# Altium PCB 0.PCB1.PcbDoc (part 2 of 10)
Units mil, origin at the board's own origin, x right, y up, seen from the top; angles counter-clockwise.
Board outline 3897.64 x 3897.64 mil, 6 copper layers (Top Layer, Layer 1, Layer 3, Layer 4, Layer 2, Bottom Layer), stack 60.567 mil thick; 715 components, 563 nets, 2530 pads, 1442 vias.
Unrouted connection lines stored in the file: 6.
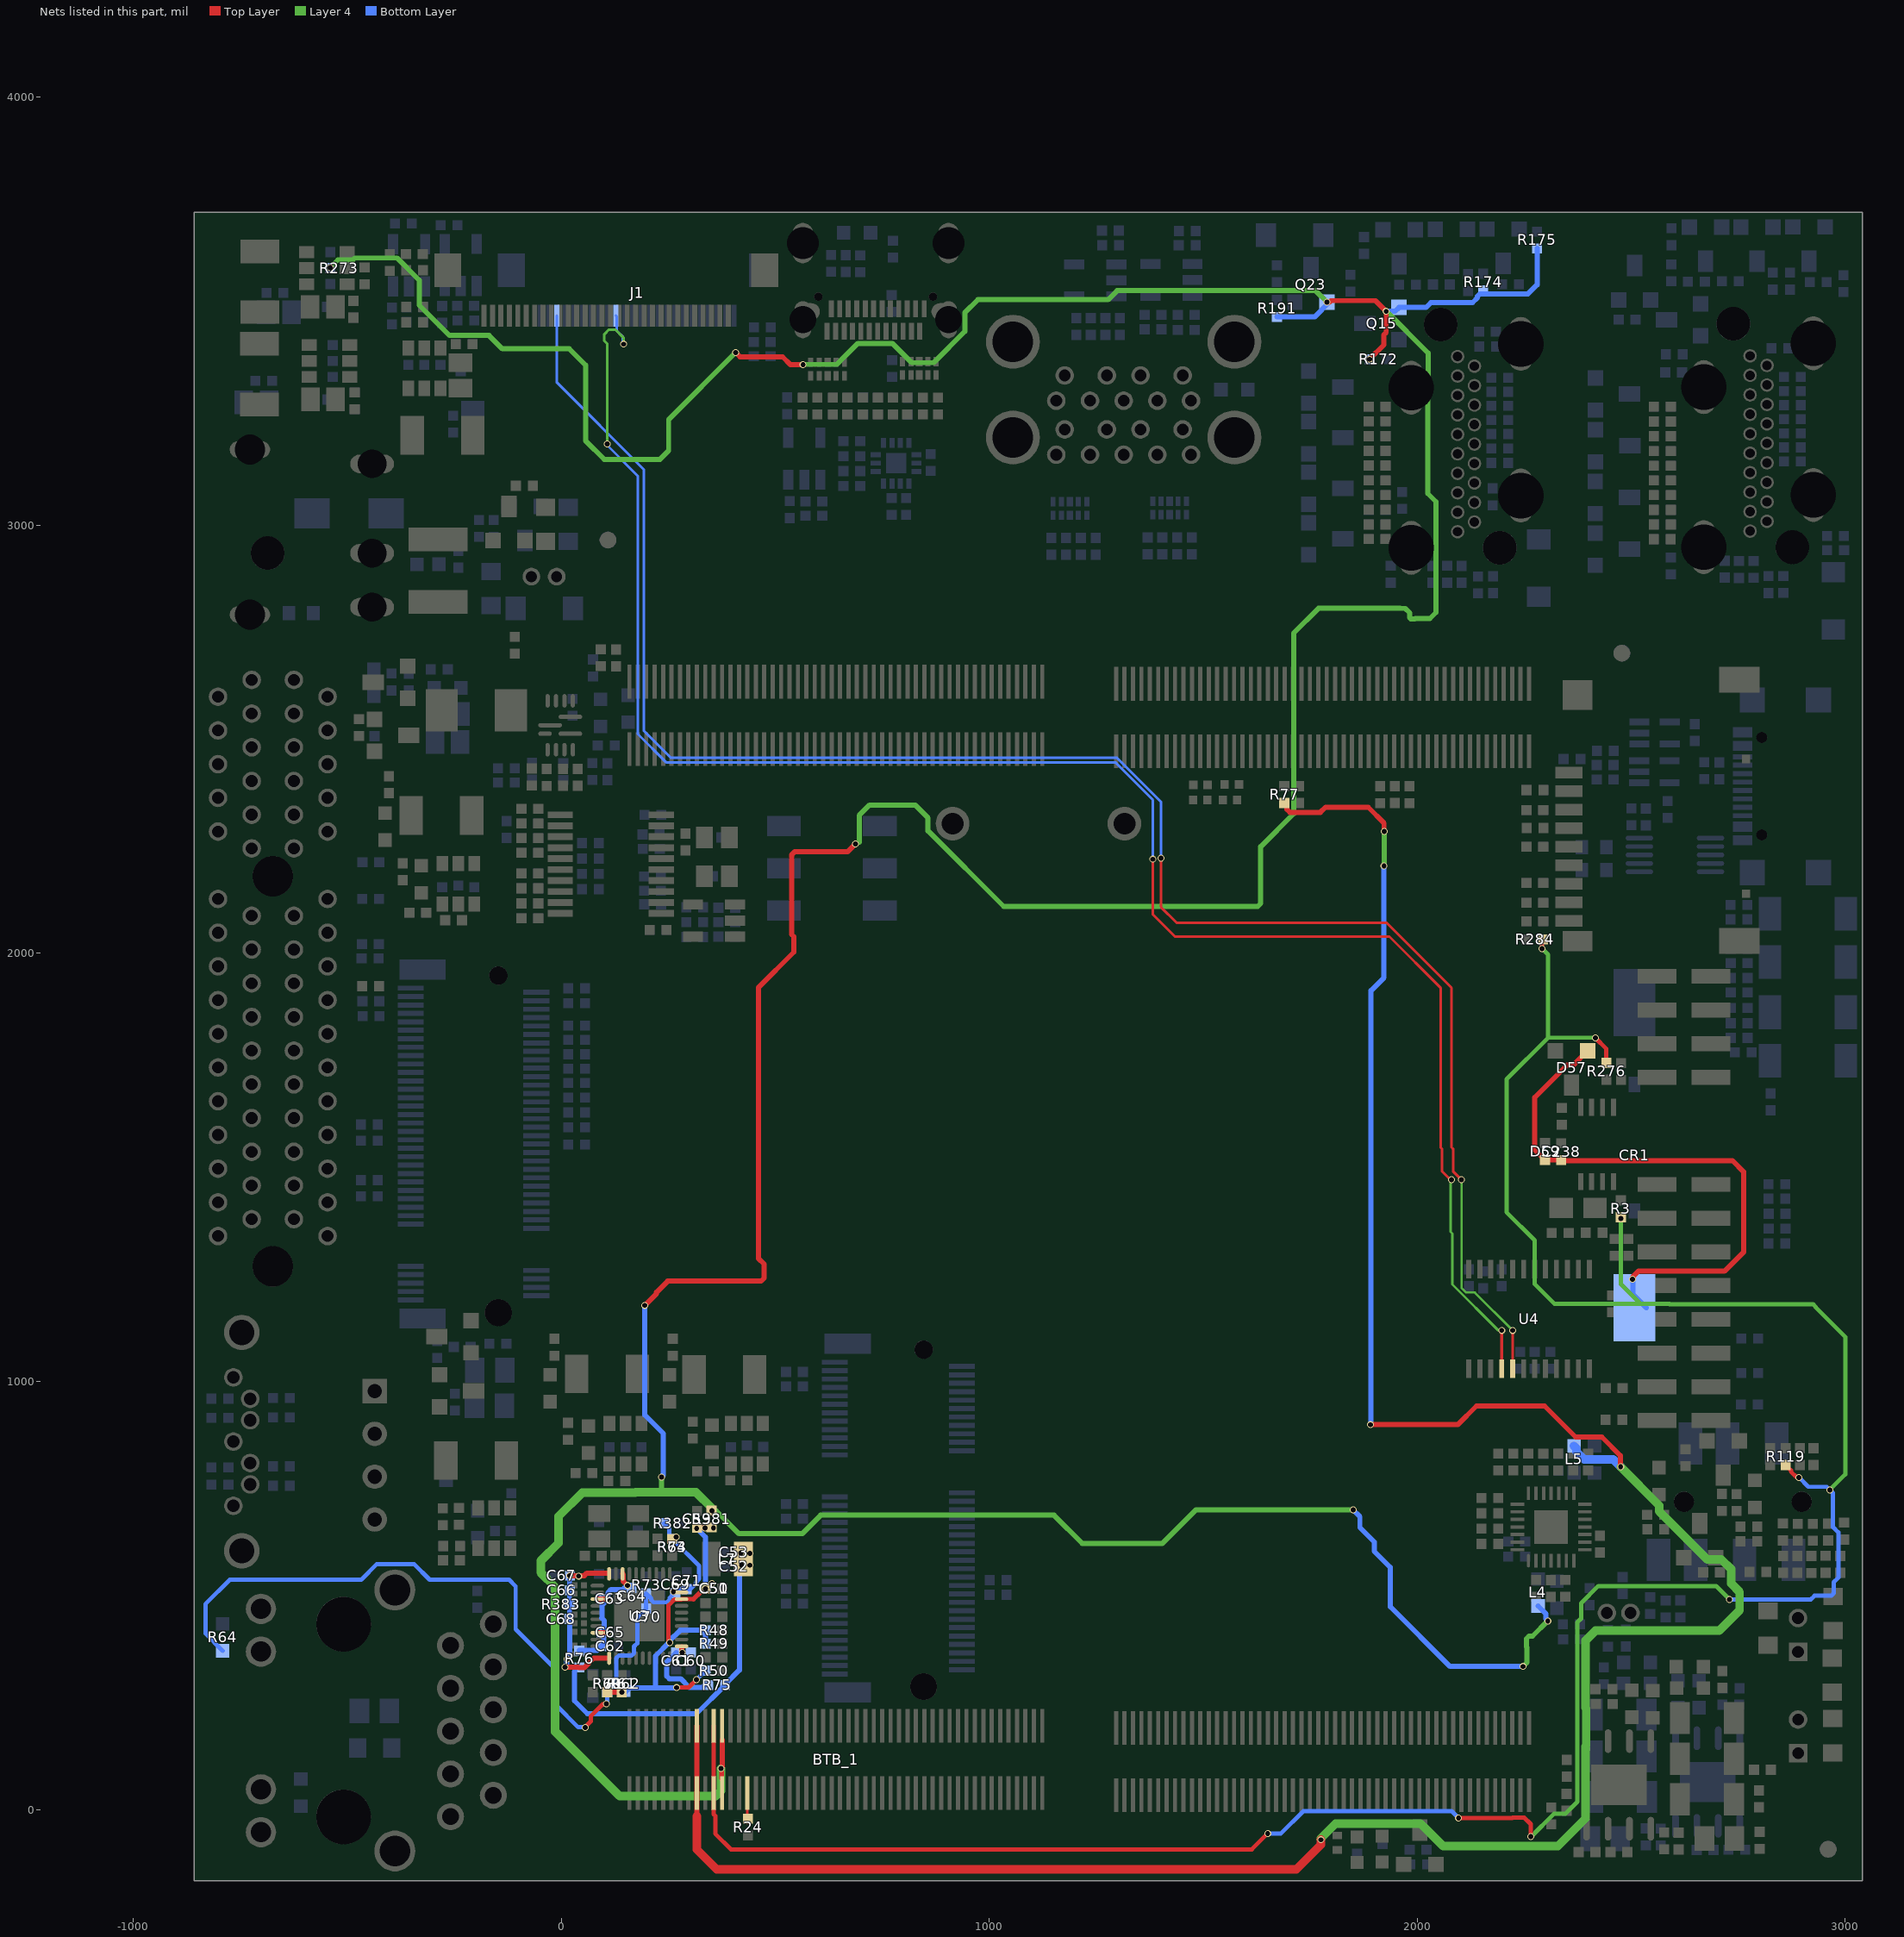
[diagram p6: the nets of this part, all layers, seen from the top]

## Components (designator, comment, footprint, x,y, rotation, side; value= is the part's Value field where it differs from the comment) (continued)
R137 "0R" R0402 -445.1,1923.3 r180 bottom
R138 "100K" R0402 337.09,790.05 r180 top
R139 "10K" R0402 415.06,768.85 r180 top
R140 "1K" R0402 433.9,830.72 r90 bottom
R141 "30K" R0402 337.09,790.05 r180 bottom
R142 "2.2R" R0402 545.29,1021.95 r0 bottom
R143 "2.2R" R0402 545.29,988.15 r0 bottom
R144 "1K" R0402 1020.69,535.95 r0 bottom
R145 "22R" R0402 545.29,549.65 r0 bottom
R146 "1K" R0402 1020.59,501.55 r0 bottom
R147 "4.7K" R0402 545.29,480.75 r0 bottom
R148 "22R" R0402 545.29,515.35 r0 bottom
R149 "20K" R0402 1947.7,2370.7 r270 top
R150 "10K" R0402 1981.9,2370.62 r90 top
R151 "4.7K" R0402 2600.5,3399.21 r0 bottom
R152 "4.7K" R0402 2593.4,3589.79 r270 bottom
R153 "1K" R0402 2830.6,3570.21 r90 bottom
R154 "4.7K" R0402 2995.7,3564.31 r90 bottom
R155 "4.7K" R0402 2936.9,3568.21 r180 bottom
R156 "0R" R0402 2599.02,3357.11 r180 bottom
R157 "47K" R0402 2731.4,3570.01 r0 bottom
R158 "47K" R0402 2652.3,3569.11 r180 bottom
R159 "1.2K" R0402 2592.6,2904.8 r90 bottom
R160 "47K" R0402 2594,3673.91 r270 bottom
R161 "499R" R0402 2572.7,3035.99 r180 bottom
R162 "499R" R0402 2572.7,3070.39 r180 bottom
R163 "499R" R0402 2572.7,3242.39 r180 bottom
R164 "499R" R0402 2572.7,3276.79 r180 bottom
R165 "499R" R0402 2572.7,3173.59 r180 bottom
R166 "499R" R0402 2572.7,3207.99 r180 bottom
R167 "499R" R0402 2572.7,3104.79 r180 bottom
R168 "499R" R0402 2572.7,3139.19 r180 bottom
R169 "1K" R0402 2572.6,2967.51 r180 bottom
R170 "27K" R0402 2490.3,3480.31 r180 bottom
R171 "10K" R0402 2573.1,3002.21 r0 bottom
R172 "4.7K" R0402 1909.1,3387.74 r0 bottom
R173 "10K" R0402 1843.7,3565.46 r270 bottom
R174 "1K" R0402 2154.3,3567.94 r90 bottom
R175 "4.7K" R0402 2280,3666.34 r90 bottom
R176 "10K" R0402 2218.22,3562.74 r180 bottom
R177 "0R" R0402 1938.21,2885.54 r270 bottom
R178 "47K" R0402 2056.3,3562.44 r180 bottom
R179 "47K" R0402 1977.62,3561.94 r180 bottom
R180 "1.2K" R0402 1965,3057.8 r270 bottom
R181 "47K" R0402 1875.6,3653.64 r270 bottom
R182 "499R" R0402 1906.5,3035.94 r180 bottom
R183 "499R" R0402 1906.5,3070.42 r180 bottom
R184 "499R" R0402 1906.5,3242.77 r180 bottom
R185 "499R" R0402 1906.5,3277.24 r180 bottom
R186 "499R" R0402 1906.5,3173.83 r180 bottom
R187 "499R" R0402 1906.5,3208.3 r180 bottom
R188 "499R" R0402 1906.5,3104.89 r180 bottom
R189 "499R" R0402 1906.5,3139.36 r180 bottom
R190 "1K" R0402 1905.81,3002.04 r180 bottom
R191 "27K" R0402 1672.5,3506.34 r90 bottom
R192 "10K" R0402 1906.01,2967.84 r0 bottom
R193 "100R" R0402 2840.2,1460.8 r180 bottom
R194 "100R" R0402 2493.4,1313 r270 top
R195 "100R" R0402 2776.1,946.2 r180 bottom
R196 "100R" R0402 2459.9,910.3 r180 top
R197 "100R" R0402 2777,1019.8 r180 bottom
R198 "100R" R0402 2460.2,984.4 r180 top
R199 "100R" R0402 2776.9,1100.2 r180 bottom
R210 "0R" R0805 2970.7,172.3 r270 top
R211 "0R" R0805 2969.9,313.7 r270 top
R212 "0R" R0805 2971.6,457.73 r270 top
R213 "0R" R0805 2819.5,423.8 r270 top
R216 "33R" R0402 -73.2,2081.63 r180 top
R217 "33R" R0402 -73.2,2116.63 r180 top
R218 "100K" R0402 112.8,826.84 r90 bottom
R219 "49.9R" R0402 -73.2,2116.63 r0 bottom
R220 "49.9R" R0402 -73.2,2081.63 r0 bottom
R221 "1K" R0402 150.2,826.84 r90 bottom
R222 "10K" R0402 130.12,767.4 r180 top
R223 "10K" R0402 210.1,2277.53 r0 bottom
R224 "4.7K" R0402 210.58,2243.73 r0 bottom
R225 "10K" R0402 213.5,2146.33 r0 bottom
R226 "10K" R0402 213.98,2114.43 r0 bottom
R227 "30K" R0402 53.42,785.8 r180 bottom
R228 "33R" R0402 -73.2,2151.63 r180 top
R229 "33R" R0402 -73.2,2186.63 r180 top
R230 "22R" R0402 290.18,2260.25 r270 top
R231 "49.9R" R0402 -73.2,2186.63 r0 bottom
R232 "49.9R" R0402 -73.2,2151.63 r0 bottom
R233 "10K" R0402 213.18,2179.63 r180 bottom
R234 "470R" R0402 214.35,2323.56 r180 bottom
R235 "2.2R" R0402 68.38,2221.5 r180 bottom
R236 "10K" R0402 36.1,1831.2 r0 bottom
R237 "10K" R0402 36.22,1553.1 r0 bottom
R238 "33R" R0402 -73,2234.63 r180 top
R239 "33R" R0402 -73,2268.97 r180 top
R240 "49.9R" R0402 -73,2268.97 r0 bottom
R241 "49.9R" R0402 -73,2234.63 r0 bottom
R242 "33R" R0402 -73,2303.3 r180 top
R243 "33R" R0402 -73,2337.63 r180 top
R244 "49.9R" R0402 -127.7,2289.3 r270 bottom
R245 "49.9R" R0402 -73,2303.3 r0 bottom
R246 "1K" R0402 386.98,2106.43 r180 bottom
R247 "0R" R0402 -444.6,2212.5 r180 bottom
R248 "0R" R0402 -445.3,2127.1 r180 bottom
R249 "100K" R0402 -334.88,2094.8 r180 top
R250 "30K" R0402 -277.78,2134.54 r90 bottom
R251 "1K" R0402 -251.26,2077.4 r180 top
R252 "10K" R0402 -240.38,2138.48 r90 bottom
R255 "10K" R0402 -356.05,2633.67 r270 bottom
R256 "1K" R0402 -472.35,2527.57 r90 top
R257 "10K" R0402 -436.15,2527.17 r270 bottom
R271 "20K" R0402 -513.93,3346.4 r180 bottom
R272 "100K" R0402 -485.21,3504.71 r270 top
R273 "1K" R0402 -519.55,3600.68 r180 bottom
R274 "30K" R0402 -519.55,3563.27 r180 bottom
R275 "22R" R0402 2361.7,2453.8 r180 bottom
R276 "10K" R0402 2442,1724.58 r270 top
R277 "22R" R0402 2476.5,1724.08 r90 top
R278 "22R" R0402 2275.16,2381.32 r0 top
R279 "22R" R0402 2275.08,2334.42 r0 top
R280 "0R" R0402 2275.08,2248.92 r0 top
R281 "22R" R0402 2275.08,2164.32 r0 top
R282 "22R" R0402 2275.08,2118.32 r0 top
R283 "100R" R0402 2275.08,2075.02 r0 top
R284 "NC" R0402 2274.58,2032.7 r180 top
R285 "0R" R0402 2439.31,2473.22 r0 bottom
R290 "100R" R0402 2534.26,2318.6 r90 bottom
R291 "100R" R0402 2500.66,2319.2 r90 bottom
R301 "NC" R0402 -342.9,3633.2 r0 top
R303 "NC" R0402 -342.4,3595.6 r0 top
R306 "1K" R0402 -400.5,3613.9 r90 top
R308 "3.4K" R0402 -278.1,3492.62 r270 bottom
R309 "3.4K" R0402 -395.5,3489.12 r270 bottom
R316 "115K" R0402 -255.82,615.47 r180 bottom
R317 "10K" R0402 -117.92,631.09 r90 bottom
R318 "1K" R0402 -154.92,630.97 r90 bottom
R319 "10K" R0402 -289.62,1074.5 r90 bottom
R320 "1K" R0402 -147.8,1088.1 r180 bottom
R321 "10K" R0402 -231.1,1080.6 r180 bottom
R322 "20K" R0402 -256.4,582.07 r180 top
R323 "3.4K" R0402 1460.2,3491.23 r180 bottom
R324 "NC" R0402 1383,3457.96 r180 bottom
R325 "470R" R0402 2557.41,654.82 r180 top
R326 "300K" R0402 2774.71,626.52 r180 top
R327 "0R" R0402 2796.11,554.82 r0 top
R328 "10K" R0402 -445.1,1923.3 r180 top
R334 "1K" R0402 2002.22,-93.8 r180 bottom
R335 "10K" R0402 2003.42,-128.2 r0 bottom
R341 "0R" R0603 2637.01,333.55 r180 top
R342 "NC" R0603 2637.41,283.95 r180 top
R343 "20K" R0402 2576.71,-73.45 r90 top
R344 "20K" R0402 2471.41,-99.65 r0 top
R345 "1K" R0402 2348.81,16.83 r270 top
R346 "10K" R0402 2313.4,-14.7 r90 top
R347 "0R" R0603 2513.21,294.45 r0 bottom
R348 "NC" R0603 2513.51,343.65 r0 bottom
R349 "20K" R0402 2569.01,-64.33 r90 bottom
R350 "20K" R0402 2672.59,-94.65 r180 bottom
R351 "1K" R0402 2799.9,-72 r270 top
R352 "10K" R0402 2798.6,24.7 r90 top
R354 "27K" R0402 1672.1,3587.64 r90 bottom
R373 "0R" R0201 42.53,523.9 r180 top
R374 "0R" R0201 42.53,504.2 r180 top
R375 "0R" R0201 42.53,474.9 r180 top
R376 "0R" R0201 42.53,455.1 r180 top
R377 "0R" R0201 42.53,434.9 r180 top
R378 "0R" R0201 42.53,415 r180 top
R379 "0R" R0201 42.53,383.1 r180 top
R380 "0R" R0201 42.53,363.1 r180 top
R381 "0R" R0402 351.2,678.7 r90 top
R382 "0R" R0402 260.32,668.7 r0 bottom
R383 "0R" R0402 -0.1,478.6 r180 bottom
R386 "1M" R0402 146.36,593.08 r0 top
R387 "22R" R0402 74.9,592.71 r0 top
SPK1 "FS1508MB0810-H8.0" BEEP-TH_BD15.0-P10.20-D1.2 1115.31,2302.9 r180 bottom
SW1 "GT-TC029B-H020-L1N" SW-SMD_L3.9-W2.9-P4.15-LS5.0 2912.81,1748.9 r180 bottom
SW2 "GT-TC029B-H020-L1N" SW-SMD_L3.9-W2.9-P4.15-LS5.0 2912.81,1862.3 r180 bottom
SW3 "GT-TC029B-H020-L1N" SW-SMD_L3.9-W2.9-P4.15-LS5.0 2912.81,1979.5 r180 bottom
SW4 "GT-TC029B-H020-L1N" SW-SMD_L3.9-W2.9-P4.15-LS5.0 2912.81,2092.1 r180 bottom
SW5 "MST22D18G2" SW-SMD_MST22D18G2 632.3,2198.6 r270 bottom
U1 "ASP9135ZC-R" SOT23_6 -319.6,3367.02 r0 top
U2 "MP8759GD-Z" QFN12-2R00X3R00 -2.12,2532.79 r180 top
U3 "RTL8211F" qfp_40p_r 182.89,452.11 r0 top
U4 "XL9535" TSSOP24-0R65-7R80X4R40 2261.4,1145.8 r90 top
U5 "FUSB302BMPX" WQFN14-0R50-2R5X2R5EP1R45X1R45 782.66,3145 r0 bottom
U6 "LPW5209AB5F" SOT23-5 568,3155.6 r180 bottom
U7 "LPW5209AB5F" SOT23-5 1248,3572.03 r270 bottom
U8 "RCLAMP0524P" USON_10 836.87,3366.65 r0 top
U9 "RCLAMP0524P" USON_10 622.53,3364.75 r0 top
U10 "RCLAMP0524P" USON_10 1188.59,3039.08 r0 bottom
U11 "RCLAMP0524P" USON_10 1421.51,3040.38 r0 bottom
U16 "ES8388" qfn28_0r45-4x4EP2R6X2R6 2312.97,659.92 r90 top
U17 "ASP9135ZC-R" SOT23_6 433.9,854.34 r180 top
U18 "CH340E" MSOP-10_L3.0-W3.0-P0.50-LS5.0-BL -10891.9,20223.34 r270 bottom
U23 "D2315-3R3" DFN1006-2L-BI 1813.4,-77.5 r90 top
U25 "ASP9135ZC-R" SOT23_6 150.2,854.4 r180 top
U26 "RS2CG5705BLE" TSSOP20 115.92,2208.41 r90 top
U27 "TP5108E23E-33" SOT23-5 357.28,2076.43 r90 top
U28 "ASP9135ZC-R" SOT23_6 -240.38,2162.1 r180 top
U31 "ASP9135ZC-R" SOT23_6 -541.49,3383.8 r270 top
U32 "ASP9135ZC-R" SOT23_6 -547.11,3600.68 r270 top
U33 "74LVC1G125GW" SOT-353 2554.03,2424.54 r90 bottom
U34 "74LVC1G125GW" SOT-353 2554.53,2515.04 r90 bottom
U35 "BM8563EMA" msop-8 2420.3,1553.7 r0 top
U39 "LPW5209AB5F" SOT23-5 -234.73,3607.89 r180 bottom
U40 "LPW5209AB5F" SOT23-5 -355.4,3607.2 r180 bottom
U42 "NS4110B" SOP-8-EP-2R5X3R4 2470.91,57.45 r0 top
U43 "ASP9135ZC-R" SOT23_6 -156.42,657.57 r180 top
U46 "NS4110B" SOP-8-EP-2R5X3R4 2678.41,64.15 r180 bottom
U48 "LPW5209AB5F" SOT23-5 1425.8,3572.93 r270 bottom
USBC1 "ZX-TYPEC-WTM1628" USB-C-SMD_ZX-TYPEC-WTM1628 2893.76,2390.32 r270 bottom
Y2 "25MHz" 3225 133.98,661.71 r0 top
Y4 "25MHz" 3225 363.98,2225.33 r90 top
Y5 "32.768KHz" 3215 2375.9,1405.1 r0 top

## Footprints (in the part's own frame and the unit in brackets; to place one, negate y for a bottom-side part, rotate by r counter-clockwise, add the part's x,y. Pads: shape width x height; smd on the part's side, far side on the other; paste and mask are expansions set on the pad)
3215 [mil] "3215"
  rect 55.12x47.24 smd: 1(-39.4,0) 2(39.4,0)
  silkscreen extent -75,-35 75,35, body extent -67,-24 67,24, height 150
3225 [mm] "3225"
  rect 1.3x1 smd: 1(-1.15,-0.75) 2(1.15,-0.75) 3(1.15,0.75) 4(-1.15,0.75)
  silkscreen extent -2.41,-1.52 0.3,1.2, body extent -1.9,-1.4 1.9,1.4, height 3.81
audio_smd_7p_6r0x8r8 [mm] "AUDIO_SMD_7P_6R0X8R8"
  rect 2.5x1.4 smd: 1(3.45,-3.125) 2(3.45,-0.225) 3(3.45,2.675) 4(-3.45,2.975) 6(-3.45,-2.125) 7(-3.45,0.775) 8(3.45,4.875)
  round 1.2 hole 1.2 unplated: ""(0,-3.625) ""(0,3.375)
  silkscreen extent -3,-7.13 4.25,7.38, body extent -5,-7.63 5,7.63, height 3.81
BEEP-TH_BD15.0-P10.20-D1.2 [mm]
  round 2 hole 1.3 paste+0 mask+0.051: 1(-5.1,0) 2(5.1,0)
  silkscreen extent -7.5,-7.5 7.5,7.5
C0402 [mil] "C0402"
  rect 23.6x23.6 smd: 1(-19.68,0) 2(19.68,0)
  silkscreen extent -37,-17 37,17, body extent -37,-17 37,17, height 150
C0603 [mil] "C0603"
  rect 31.5x31.5 smd: 1(-31.5,0) 2(31.5,0)
  silkscreen extent -55,-25 55,25, body extent -48,-16 48,16, height 150
C0603_L [mm] "贴片MLCC电容"
  rect 0.75x0.85 smd: 1(-0.725,0) 2(0.725,0)
  silkscreen extent -1.35,-0.69 1.35,0.69, body extent -0.8,-0.4 0.8,0.4, height 0.8
C0805#1 [mm] "Chip Capacitor, Body 2.0x1.3mm, IPC High Density"
  rect 1.1x1.4 smd: 1(-0.75,0) 2(0.75,0)
  body extent -1.1,-0.72 1.1,0.72, height 1.4
C0805#2 [mm] "C0805"
  rect 1.16x1.47 smd: 1(-0.89,0) 2(0.89,0)
  silkscreen extent -1.77,-1.04 1.77,1.04, body extent -1.47,-0.74 1.47,0.74, height 3.81
C1206 [mil] "C1206"
  rect 47.24x74.8 smd: 1(-62.99,0) 2(62.99,0)
  silkscreen extent -94,-47 94,47
CR1220_A [mm] "纽扣电池座                         淘宝ID:黄晶宝石"
  rect 0.9x0.7 smd: 0(-3.6,0) 0(3.9,0)
  rect 4x2.5 smd: 1(9.652,0) 2(-8.458,0)
  silkscreen extent -7.5,-7.5 10.16,7.5, body extent -9.42,-7.45 10.34,7.45, height 4.05
dc_in_th_3p_10r1x11r6 [mil] "DC_IN_TH_3P_10R1X11R6"
  oval 94.5x39.4 / inner round 60 / far side oval 94.5x39.4 hole 70.9 slot 15.7 at 90 deg: 1(-111.25,-194.9) 5(-111.25,190.9)
  oval 102.4x43.3 hole 66.9 slot 19.7 at 90 deg: 2(174.25,-51.2) 3(174.25,157.4)
  oval 102.4x43.3 / inner round 60 / far side oval 102.4x43.3 hole 66.9 slot 19.7 at 90 deg: 4(174.25,-177.2)
  round 78.7 hole 78.7 unplated: ""(-69.85,-51.2)
  silkscreen extent -232,-201 226,197, body extent -237,-228 237,228, height 150
DFN1006-2L-BI [mm]
  rect 0.45x0.55 smd paste+0 mask+0.051: 1(-0.425,0) 2(0.425,0)
  silkscreen extent -0.8,-0.4 0.8,0.4
esd0402 [mil] "ESD0402"
  rect 23.6x23.6 smd: 1(-19.68,0) 2(19.68,0)
  silkscreen extent -37,-17 37,17, body extent -37,-17 37,17, height 150
F1812 [mil] "1812贴片自恢复保险丝(PPTC)"
  rect 55.38x137.76 smd: 1(-72.97,0) 2(72.97,0)
  silkscreen extent -110,-79 110,79, body extent -89,-63 89,63, height 41
F_100PIN [mm] "0.5双槽板对板母座，100P"
  rect 2x0.25 smd: 1(-2,-12.25) 2(-2,-11.75) 3(-2,-11.25) 4(-2,-10.75) 5(-2,-10.25) 6(-2,-9.75) 7(-2,-9.25) 8(-2,-8.75) 9(-2,-8.25) 10(-2,-7.75) 11(-2,-7.25) 12(-2,-6.75) 13(-2,-6.25) 14(-2,-5.75) 15(-2,-5.25) 16(-2,-4.75) 17(-2,-4.25) 18(-2,-3.75) 19(-2,-3.25) 20(-2,-2.75) 21(-2,-2.25) 22(-2,-1.75) 23(-2,-1.25) 24(-2,-0.75) 25(-2,-0.25) 26(-2,0.25) 27(-2,0.75) 28(-2,1.25) 29(-2,1.75) 30(-2,2.25) 31(-2,2.75) 32(-2,3.25) 33(-2,3.75) 34(-2,4.25) 35(-2,4.75) 36(-2,5.25) 37(-2,5.75) 38(-2,6.25) 39(-2,6.75) 40(-2,7.25) 41(-2,7.75) 42(-2,8.25) 43(-2,8.75) 44(-2,9.25) 45(-2,9.75) 46(-2,10.25) 47(-2,10.75) 48(-2,11.25) 49(-2,11.75) 50(-2,12.25) 51(2,12.25) 52(2,11.75) 53(2,11.25) 54(2,10.75) 55(2,10.25) 56(2,9.75) 57(2,9.25) 58(2,8.75) 59(2,8.25) 60(2,7.75) 61(2,7.25) 62(2,6.75) 63(2,6.25) 64(2,5.75) 65(2,5.25) 66(2,4.75) 67(2,4.25) 68(2,3.75) 69(2,3.25) 70(2,2.75) 71(2,2.25) 72(2,1.75) 73(2,1.25) 74(2,0.75) 75(2,0.25) 76(2,-0.25) 77(2,-0.75) 78(2,-1.25) 79(2,-1.75) 80(2,-2.25) 81(2,-2.75) 82(2,-3.25) 83(2,-3.75) 84(2,-4.25) 85(2,-4.75) 86(2,-5.25) 87(2,-5.75) 88(2,-6.25) 89(2,-6.75) 90(2,-7.25) 91(2,-7.75) 92(2,-8.25) 93(2,-8.75) 94(2,-9.25) 95(2,-9.75) 96(2,-10.25) 97(2,-10.75) 98(2,-11.25) 99(2,-11.75) 100(2,-12.25)
  silkscreen extent -2.54,-14.48 2,13.85
FPC-30P-0P5 [mm] "FPC-30P-0P5"
  rect 0.3x1.3 smd: 1(-7.25,2.733) 2(-6.75,2.733) 3(-6.25,2.733) 4(-5.75,2.733) 5(-5.25,2.733) 6(-4.75,2.733) 7(-4.25,2.733) 8(-3.75,2.733) 9(-3.25,2.733) 10(-2.75,2.733) 11(-2.25,2.733) 12(-1.75,2.733) 13(-1.25,2.733) 14(-0.75,2.733) 15(-0.25,2.733) 16(0.25,2.733) 17(0.75,2.733) 18(1.25,2.733) 19(1.75,2.733) 20(2.25,2.733) 21(2.75,2.733) 22(3.25,2.733) 23(3.75,2.733) 24(4.25,2.733) 25(4.75,2.733) 26(5.25,2.733) 27(5.75,2.733) 28(6.25,2.733) 29(6.75,2.733) 30(7.25,2.733)
  rect 1.6x2 smd: 31(9.4,0.032) 32(-9.4,0.032)
  silkscreen extent -10.05,-3.27 10.05,4.14, body extent -10.05,-3.35 10.05,3.35, height 3.81
fpc_24p_0p5 [mm] "FPC_24P_0P5"
  rect 0.3x1.3 smd: 1(-5.75,-2.701) 2(-5.25,-2.701) 3(-4.75,-2.701) 4(-4.25,-2.701) 5(-3.75,-2.701) 6(-3.25,-2.701) 7(-2.75,-2.701) 8(-2.25,-2.701) 9(-1.75,-2.701) 10(-1.25,-2.701) 11(-0.75,-2.701) 12(-0.25,-2.701) 13(0.25,-2.701) 14(0.75,-2.701) 15(1.25,-2.701) 16(1.75,-2.701) 17(2.25,-2.701) 18(2.75,-2.701) 19(3.25,-2.701) 20(3.75,-2.701) 21(4.25,-2.701) 22(4.75,-2.701) 23(5.25,-2.701) 24(5.75,-2.701)
  rect 1.6x2 smd: 25(7.45,0.001) 26(-7.45,0.001)
  silkscreen extent -8.1,-3.95 8.1,3.35, body extent -8.1,-3.35 8.1,3.35, height 3.81
HDMI-SMD [mm] "HDMI-SMD"
  round 0.8 hole 0.55: 1(1.276,0.5) 2(0.707,-0.5) 3(0.121,0.5) 4(-0.449,-0.5) 5(-1.034,0.5) 6(-1.605,-0.5) 7(-2.189,0.5) 8(-2.761,-0.5) 9(-3.344,0.5) 10(-3.917,-0.5) 11(-4.499,0.5) 12(-5.073,-0.5) 13(-5.654,0.5) 14(-6.229,-0.5) 15(-6.809,0.5) 16(-7.385,-0.5) 17(-7.964,0.5) 18(-8.541,-0.5) 19(-9.119,0.5)
  oval 3.2x1.4 / inner round 1.524 / far side oval 3.2x1.4 hole 2.7 slot 0.9 at 90 deg: G1(-10.074,3.25) G2(-0.574,3.25) G3(-6.974,-3.25) G4(2.026,-3.25)
  round 1.999 hole 1.999 unplated: ""(-10.074,-2) ""(3.176,1.5)
  silkscreen extent -11.43,-5.02 19.77,5, body extent -11.78,-4.05 11.78,4.05, height 3.81
HDR-SMD_HX-PZ2.0-2X4P-WT [mm]
  rect 0.89x2.3 smd paste+0 mask+0.05: 1(-3,-1.6) 2(-3,1.6) 3(-1,-1.6) 4(-1,1.6) 5(1,-1.6) 6(1,1.6) 7(3,-1.6) 8(3,1.6)
  silkscreen extent -4.16,-10.15 4,-1.81
HY911130A [mm] "HY911130A"
  round 1.6 / inner round 1.524 / far side round 1.6 hole 1: 1(5.629,-8.79) 2(4.359,-6.25) 3(3.089,-8.79) 4(1.819,-6.25) 5(0.549,-8.79) 6(-0.721,-6.25) 7(-1.991,-8.79) 8(-3.261,-6.25) 9(-4.531,-8.79)
  round 1.6 hole 1: 10(-5.801,-6.25)
  round 1.8 / inner round 1.524 / far side round 1.8 hole 1.2: 11(6.534,5) 12(3.994,5) 13(-4.177,5) 14(-6.717,5)
  round 2.43 / inner round 1.524 / far side round 2.43 hole 1.83: 15(7.654,-2.95) 16(-7.836,-2.95)
  round 3.25 hole 3.25 unplated: ""(-5.806,0.1) ""(5.624,0.1)
  silkscreen extent -8.11,-10.3 7.93,17.1, body extent -9.11,-11.1 9.11,11.1, height 3.81
L0518 [mm] "L0518"
  rect 1.9x2.5 smd: 1(-2.05,0) 2(2.05,0)
  silkscreen extent -2.75,-2.65 2.75,2.65, body extent -3.1,-2.8 3.1,2.8, height 3.81
L0603#1 [mm] "0603贴片叠层电感"
  rect 0.75x0.85 smd: 1(-0.725,0) 2(0.725,0)
  silkscreen extent -1.35,-0.69 1.35,0.69, body extent -0.8,-0.4 0.8,0.4, height 0.8
L0603#2 [mm] "L0603"
  rect 0.8x0.8 smd: 1(-0.8,0) 2(0.8,0)
  silkscreen extent -1.38,-0.61 1.4,0.61, body extent -1.2,-0.4 1.2,0.4, height 3.81
L2520 [mil] "L2520"
  rect 44x80 smd: 1(-37.75,0) 2(37.75,0)
  silkscreen extent -68,-48 68,48, body extent -65,-45 65,45, height 150
l4520 [mil] "L4520"
  rect 55.12x90.55 smd: 1(-70.97,-0.1) 2(70.77,-0.1)
  silkscreen extent -91,-87 90,87, body extent -91,-87 91,87, height 150
LED0603_R [mil] "红色0603LED"
  rect 30x30 smd: 1(-30,0) 2(30,0)
  silkscreen extent -53,-23 61,23, body extent -31,-16 32,16, height 18
M2_NGFF_E_KEY [mm] "M2_NGFF_E_KEY"
  rect 0.3x1.55 smd: 1(9.25,-3.3) 2(9,4.25) 3(8.75,-3.3) 4(8.5,4.25) 5(8.25,-3.3) 6(8,4.25) 7(7.75,-3.3) 8(7.5,4.25) 9(7.25,-3.3) 10(7,4.25) 11(6.75,-3.3) 12(6.5,4.25) 13(6.25,-3.3) 14(6,4.25) 15(5.75,-3.3) 16(5.5,4.25) 17(5.25,-3.3) 18(5,4.25) 19(4.75,-3.3) 20(4.5,4.25) 21(4.25,-3.3) 22(4,4.25) 23(3.75,-3.3) 32(1.5,4.25) 33(1.25,-3.3) 34(1,4.25) 35(0.75,-3.3) 36(0.5,4.25) 37(0.25,-3.3) 38(0,4.25) 39(-0.25,-3.3) 40(-0.5,4.25) 41(-0.75,-3.3) 42(-1,4.25) 43(-1.25,-3.3) 44(-1.5,4.25) 45(-1.75,-3.3) 46(-2,4.25) 47(-2.25,-3.3) 48(-2.5,4.25) 49(-2.75,-3.3) 50(-3,4.25) 51(-3.25,-3.3) 52(-3.5,4.25) 53(-3.75,-3.3) 54(-4,4.25) 55(-4.25,-3.3) 56(-4.5,4.25) 57(-4.75,-3.3) 58(-5,4.25) 59(-5.25,-3.3) 60(-5.5,4.25) 61(-5.75,-3.3) 62(-6,4.25) 63(-6.25,-3.3) 64(-6.5,4.25) 65(-6.75,-3.3) 66(-7,4.25) 67(-7.25,-3.3) 68(-7.5,4.25) 69(-7.75,-3.3) 70(-8,4.25) 71(-8.25,-3.3) 72(-8.5,4.25) 73(-8.75,-3.3) 74(-9,4.25) 75(-9.25,-3.3)
  rect 1.2x2.75 smd: 76(10.35,-2.525) 77(-10.35,-2.525)
  round 1.6 hole 1.6 unplated: ""(-10,1.975)
  round 1.1 hole 1.1 unplated: ""(10,1.975)
  silkscreen extent -11,-1.13 11,4.12, body extent -11,-4.13 11,4.12, height 3.81
M2_NGFF_M_KEY [mm] "M2_NGFF_M_KEY"
  rect 0.3x1.55 smd: 1(-9.25,3.762) 2(-9,-3.687) 3(-8.75,3.762) 4(-8.5,-3.687) 5(-8.25,3.762) 6(-8,-3.687) 7(-7.75,3.762) 8(-7.5,-3.687) 9(-7.25,3.762) 10(-7,-3.687) 11(-6.75,3.762) 12(-6.5,-3.687) 13(-6.25,3.762) 14(-6,-3.687) 15(-5.75,3.762) 16(-5.5,-3.687) 17(-5.25,3.762) 18(-5,-3.687) 19(-4.75,3.762) 20(-4.5,-3.687) 21(-4.25,3.762) 22(-4,-3.687) 23(-3.75,3.762) 24(-3.5,-3.687) 25(-3.25,3.762) 26(-3,-3.687) 27(-2.75,3.762) 28(-2.5,-3.687) 29(-2.25,3.762) 30(-2,-3.687) 31(-1.75,3.762) 32(-1.5,-3.687) 33(-1.25,3.762) 34(-1,-3.687) 35(-0.75,3.762) 36(-0.5,-3.687) 37(-0.25,3.762) 38(0,-3.687) 39(0.25,3.762) 40(0.5,-3.687) 41(0.75,3.762) 42(1,-3.687) 43(1.25,3.762) 44(1.5,-3.687) 45(1.75,3.762) 46(2,-3.687) 47(2.25,3.762) 48(2.5,-3.687) 49(2.75,3.762) 50(3,-3.687) 51(3.25,3.762) 52(3.5,-3.687) 53(3.75,3.762) 54(4,-3.687) 55(4.25,3.762) 56(4.5,-3.687) 57(4.75,3.762) 58(5,-3.687) 67(7.25,3.762) 68(7.5,-3.687) 69(7.75,3.762) 70(8,-3.687) 71(8.25,3.762) 72(8.5,-3.687) 73(8.75,3.762) 74(9,-3.687) 75(9.25,3.762)
  rect 1.2x2.75 smd: 76(10.35,3.062) 77(-10.35,3.062)
  round 1.1 hole 1.1 unplated: ""(-10,-1.438)
  round 1.6 hole 1.6 unplated: ""(10,-1.438)
  silkscreen extent -10.95,-81.8 10.95,1.61, body extent -10.95,-4.56 10.95,4.56, height 3.81
"Mark 1" [mm] "光学定位点，直径1mm"
  round 1 smd paste-1 mask+0.7: Mark(0,0)
  Keep-Out Layer circle w0.1: c0,0 r1.5
MIC2-4R00-TM [mm] "MIC2-4R00-TM"
  round 1.1 hole 0.7: 1(-0.7,-0.55) 2(0.7,-0.55)
  silkscreen extent -2,-2 2,2, body extent -2.11,-2.11 2.11,2.11, height 3.81
msop-8 [mm] "MSOP-8"
  rect 0.3x1 smd: 1(-0.975,-2.2) 2(-0.325,-2.2) 3(0.325,-2.2) 4(0.975,-2.2) 5(0.975,2.2) 6(0.325,2.2) 7(-0.325,2.2) 8(-0.975,2.2)
  silkscreen extent -1.5,-3.3 1.5,1.5, body extent -1.5,-2.8 1.5,2.8, height 3.81
MSOP-10_L3.0-W3.0-P0.50-LS5.0-BL [mm]
  oval 0.28x1.62 smd paste+0 mask+0.051: 1(456.035,-344.857) 2(456.535,-344.857) 3(457.035,-344.857) 4(457.535,-344.857) 5(458.035,-344.857) 6(458.035,-340.637) 7(457.535,-340.637) 8(457.035,-340.637) 9(456.535,-340.637) 10(456.035,-340.637)
  silkscreen extent 455.29,-345.01 458.61,-341.68
PCIE_64PIN_1R00 [mm] "PCIE_64PIN_1R00"
  round 1.1 hole 0.7: A1(-16.765,1.25) A2(-15.765,3.25) A3(-14.765,1.25) A4(-13.765,3.25) A5(-12.765,1.25) A6(-11.765,3.25) A7(-10.765,1.25) A8(-9.765,3.25) A9(-8.765,1.25) A10(-7.765,3.25) A11(-6.765,1.25) A12(-3.765,3.25) A13(-2.765,1.25) A14(-1.765,3.25) A15(-0.765,1.25) A16(0.235,3.25) A17(1.235,1.25) A18(2.235,3.25) A19(3.235,1.25) A20(4.235,3.25) A21(5.235,1.25) A22(6.235,3.25) A23(7.235,1.25) A24(8.235,3.25) A25(9.235,1.25) A26(10.235,3.25) A27(11.235,1.25) A28(12.235,3.25) A29(13.235,1.25) A30(14.235,3.25) A31(15.235,1.25) A32(16.235,3.25) B1(-16.765,-1.25) B2(-15.765,-3.25) B3(-14.765,-1.25) B4(-13.765,-3.25) B5(-12.765,-1.25) B6(-11.765,-3.25) B7(-10.765,-1.25) B8(-9.765,-3.25) B9(-8.765,-1.25) B10(-7.765,-3.25) B11(-6.765,-1.25) B12(-3.765,-3.25) B13(-2.765,-1.25) B14(-1.765,-3.25) B15(-0.765,-1.25) B16(0.235,-3.25) B17(1.235,-1.25) B18(2.235,-3.25) B19(3.235,-1.25) B20(4.235,-3.25) B21(5.235,-1.25) B22(6.235,-3.25) B23(7.235,-1.25) B24(8.235,-3.25) B25(9.235,-1.25) B26(10.235,-3.25) B27(11.235,-1.25) B28(12.235,-3.25) B29(13.235,-1.25) B30(14.235,-3.25) B31(15.235,-1.25) B32(16.235,-3.25)
  round 2.4 hole 2.4 unplated: ""(-5.115,0) ""(18.035,0)
  silkscreen extent -19.61,-4.39 19.61,4.39, body extent -19.61,-4.39 19.61,4.39, height 3.81
PH-1x2-2P0_l [mm] "PH-1X2-2P0_L"
  rect 1.1x1.1 hole 0.7: 1(-1,-0.6)
  round 1.1 hole 0.7: 2(1,-0.6)
  silkscreen extent -3,-2.6 3,2.6, body extent -3.1,-2.7 3.1,2.7, height 3.81
QFN12-2R00X3R00 [mm] "QFN12-2R00X3R00"
  oval 1.4x0.25 smd: 1(-0.6,0.5) 2(-0.6,-0.5) 7(0.6,0)
  oval 0.25x0.8 smd: 3(-0.75,-1.45) 4(-0.25,-1.45) 5(0.25,-1.45) 6(0.75,-1.45) 9(0.75,1.45) 10(0.25,1.45) 11(-0.25,1.45) 12(-0.75,1.45)
  oval 0.8x0.25 smd: 8(0.9,0.5)
  silkscreen extent -2.25,-2 1.5,2, body extent -1.5,-2 1.5,2, height 3.81
qfn28_0r45-4x4EP2R6X2R6 [mm] "QFN28_0R45-4X4EP2R6X2R6"
  oval 0.8x0.2 smd: 1(-2,1.35)
  rect 0.8x0.2 smd: 2(-2,0.9) 3(-2,0.45) 4(-2,0) 5(-2,-0.45) 6(-2,-0.9) 7(-2,-1.35) 15(2,-1.35) 16(2,-0.9) 17(2,-0.45) 18(2,0) 19(2,0.45) 20(2,0.9) 21(2,1.35)
  rect 0.2x0.8 smd: 8(-1.35,-2) 9(-0.9,-2) 10(-0.45,-2) 11(0,-2) 12(0.45,-2) 13(0.9,-2) 14(1.35,-2) 22(1.35,2) 23(0.9,2) 24(0.45,2) 25(0,2) 26(-0.45,2) 27(-0.9,2) 28(-1.35,2)
  rect 2x2 smd: 29(0,0)
  silkscreen extent -3.15,-2 2,2.03, body extent -2.5,-2.5 2.5,2.5, height 3.81
qfp_40p_r [mil] "QFP_40P_R"
  oval 31.5x8.66 smd: 1(-98.43,70.87) 2(-98.43,55.12) 3(-98.43,39.37) 4(-98.43,23.62) 5(-98.43,7.87) 6(-98.43,-7.87) 7(-98.43,-23.62) 8(-98.43,-39.37) 9(-98.43,-55.12) 10(-98.43,-70.87) 21(98.43,-70.87) 22(98.43,-55.12) 23(98.43,-39.37) 24(98.43,-23.62) 25(98.43,-7.87) 26(98.43,7.87) 27(98.43,23.62) 28(98.43,39.37) 29(98.43,55.12) 30(98.43,70.87)
  oval 8.66x31.5 smd: 11(-70.87,-98.43) 12(-55.12,-98.43) 13(-39.37,-98.43) 14(-23.62,-98.43) 15(-7.87,-98.43) 16(7.87,-98.43) 17(23.62,-98.43) 18(39.37,-98.43) 19(55.12,-98.43) 20(70.87,-98.43) 31(70.87,98.43) 32(55.12,98.43) 33(39.37,98.43) 34(23.62,98.43) 35(7.87,98.43) 36(-7.87,98.43) 37(-23.62,98.43) 38(-39.37,98.43) 39(-55.12,98.43) 40(-70.87,98.43)
  rect 118.11x118.11 smd: 41(0,0)
  silkscreen extent -124,-98 98,124, body extent -116,-116 116,116, height 150
R0201 [mm] "R0201"
  rect 0.35x0.35 smd: 1(-0.275,0) 2(0.275,0)
  silkscreen extent -0.51,-0.25 0.51,0.25, body extent -0.47,-0.18 0.47,0.18, height 3.81
R0402 [mil] "R0402"
  rect 23.6x23.6 smd: 1(-19.68,0) 2(19.68,0)
  silkscreen extent -37,-17 37,17, body extent -37,-17 37,17, height 150
R0402_L [mm] "1/16W贴片电阻"
  rect 0.5x0.5 smd: 1(-0.425,0) 2(0.425,0)
  silkscreen extent -0.88,-0.46 0.87,0.46, body extent -0.5,-0.25 0.5,0.25, height 0.3
R0603 [mil] "R0603"
  rect 31.5x31.5 smd: 1(-31.5,0) 2(31.5,0)
  silkscreen extent -55,-24 55,24, body extent -47,-16 47,16, height 150
R0805 [mil] "R0805"
  rect 40x45 smd: 1(40,0) 2(-40,0)
  silkscreen extent -70,-35 70,35, body extent -60,-25 60,25, height 150
SMA_CA [mm] "SMA_CA"
  rect 2.1x1.8 smd: 1(-2.2,0) 2(2.2,0)
  silkscreen extent -2.2,-1.3 2.2,1.3, body extent -3.3,-1.4 3.3,1.4, height 3.81
SOD523 [mm] "SOD523"
  rect 0.6x0.7 smd: 1(-0.71,0) 2(0.71,0)
  silkscreen extent -1.3,-0.5 0.6,0.5, body extent -1.1,-0.4 1.1,0.4, height 3.81
SOD-123 [mm] "SOD-123"
  rect 1.2x1.4 smd: 1(1.7,0) 2(-1.7,0)
  silkscreen extent -1.8,-0.9 1.8,0.9, body extent -2.4,-1 2.4,1, height 3.81
SOP-8-EP-2R5X3R4 [mm] "SOP-8-EP-2R5X3R4"
  oval 0.4x1.4 smd: 1(-1.905,-2.6) 2(-0.635,-2.6) 3(0.635,-2.6) 4(1.905,-2.6) 5(1.905,2.6) 6(0.635,2.6) 7(-0.635,2.6) 8(-1.905,2.6)
  rect 3.3x2.4 smd: 9(0,0)
  silkscreen extent -2.79,-3.18 2.5,2, body extent -2.5,-3 2.5,3, height 3.81
SOT23 [mil] "SOT23"
  rect 36x36 smd: 1(-37.5,-43.5) 2(37.5,-43.5)
  rect 36x50 smd: 3(0,36.5)
  silkscreen extent -55,-55 55,36, body extent -56,-62 56,62, height 150
SOT23-5 [mm] "SOT23-5"
  rect 0.599x1.199 smd: 1(-0.95,-1.25) 2(0,-1.25) 3(0.95,-1.25) 4(0.95,1.25) 5(-0.95,1.25)
  silkscreen extent -1.96,-1.85 1.5,0.9, body extent -1.6,-1.9 1.6,1.9, height 3.81
SOT23_6 [mm] "SOT23_6"
  rect 0.7x0.9 smd: 1(-0.95,-1.2) 2(0,-1.2) 3(0.95,-1.2) 4(0.95,1.2) 5(0,1.2) 6(-0.95,1.2)
  silkscreen extent -2.19,-1.25 1.4,0.6, body extent -1.4,-1.2 1.4,1.2, height 3.81
SOT-353 [mil] "SOT-353"
  rect 16x47 smd: 1(-25.91,-35.43) 2(-0.31,-35.43) 3(25.28,-35.43) 4(25.28,35.43) 5(-25.91,35.43)
  silkscreen extent -55,-80 45,70, body extent -40,-65 40,65, height 150
ssata_v [mm] "SSATA_V"
  round 1.1 hole 0.75: 1(-3.81,0.95) 2(-2.54,-0.05) 3(-1.27,-0.05) 4(0,0.95) 5(1.27,-0.05) 6(2.54,-0.05) 7(3.81,0.95)
  round 2.1 hole 1.5: S1(6.48,0.45) S2(-6.48,0.45)
  silkscreen extent -8,-3.25 8,3.2, body extent -8.1,-3.25 8.1,3.25, height 3.81
SW-SMD_L3.9-W2.9-P4.15-LS5.0 [mm]
  rect 1.35x2 smd paste+0 mask+0.051: 1(-2.25,0) 2(2.25,0)
  silkscreen extent -2,-1.45 2,1.45
SW-SMD_MST22D18G2 [mm]
  rect 1.2x2 smd: 1(-2.5,2.85) 2(0,2.85) 3(2.5,2.85) 4(-2.5,-2.85) 5(0,-2.85) 6(2.5,-2.85)
  silkscreen extent -4.6,-1.78 4.57,1.8
TFCARD [mil] "TFCARD"
  rect 27.56x62.99 smd: 1(88.58,206.82) 2(45.27,206.82) 3(1.97,206.82) 4(-41.34,206.82) 5(-84.65,206.82) 6(-127.95,206.82) 7(-171.26,206.82) 8(-214.57,206.82) 9(-257.88,206.82)
  rect 47.24x70 smd: 10(-305.12,187.13)
  rect 60x95 smd: 11(-305.12,-190.82) 12(305.12,-190.82)
  rect 70x70 smd: 13(269.68,187.13)
  rect 19.68x19.68 smd: ""(-194.88,-206.57) ""(120.08,-206.57)
  silkscreen extent -289,-365 281,179, body extent -335,-238 335,238, height 150
TSSOP20 [mm] "TSSOP20"
  rect 0.4x1.5 smd: 1(-2.925,-3) 2(-2.275,-3) 3(-1.625,-3) 4(-0.975,-3) 5(-0.325,-3) 6(0.325,-3) 7(0.975,-3) 8(1.625,-3) 9(2.275,-3) 10(2.925,-3) 11(2.925,3) 12(2.275,3) 13(1.625,3) 14(0.975,3) 15(0.325,3) 16(-0.325,3) 17(-0.975,3) 18(-1.625,3) 19(-2.275,3) 20(-2.925,3)
  silkscreen extent -3.31,-4.61 3.3,2.1, body extent -3.3,-3.8 3.3,3.8, height 3.81
TSSOP24-0R65-7R80X4R40 [mm] "TSSOP24-0R65-7R80X4R40"
  rect 1.1x0.3 smd: 1(-2.95,3.575) 2(-2.95,2.925) 3(-2.95,2.275) 4(-2.95,1.625) 5(-2.95,0.975) 6(-2.95,0.325) 7(-2.95,-0.325) 8(-2.95,-0.975) 9(-2.95,-1.625) 10(-2.95,-2.275) 11(-2.95,-2.925) 12(-2.95,-3.575) 13(2.95,-3.575) 14(2.95,-2.925) 15(2.95,-2.275) 16(2.95,-1.625) 17(2.95,-0.975) 18(2.95,-0.325) 19(2.95,0.325) 20(2.95,0.975) 21(2.95,1.625) 22(2.95,2.275) 23(2.95,2.925) 24(2.95,3.575)
  silkscreen extent -4.1,-3.9 2.2,3.9, body extent -3.6,-4.1 3.6,4.1, height 3.81
USB3D0-AF-18P [mm] "USB3D0-AF-18P"
  round 1.1 hole 0.7: 1(-3.5,2.899) 2(-1.001,2.899) 3(1.001,2.899) 4(3.5,2.899) 5(4,4.401) 6(1.999,4.401) 7(0,4.401) 8(-1.999,4.401) 9(-4.001,4.401) 10(-3.5,6.1) 11(-1.001,6.1) 12(1.001,6.1) 13(3.5,6.1) 14(4,7.601) 15(1.999,7.601) 16(0,7.601) 17(-1.999,7.601) 18(-4.001,7.601)
  round 3.2 / inner round 1.524 / far side round 3.2 hole 2.4: 19(6.571,0.9) 20(6.571,6.58) 21(-6.571,6.58) 22(-6.571,0.9)
  silkscreen extent -8,-16.73 8,8.77, body extent -8.4,-8.8 8.4,8.8, height 3.81
usb-c-smd_tyc-324g [mm] "USB-C-SMD_TYC-324G"
  oval 1x2.2 hole 1.6 slot 0.6 at 0 deg: 1(-4.32,2.99) 4(4.32,2.99)
  oval 1.2x2.4 / inner round 1.524 / far side oval 1.2x2.4 hole 1.9 slot 0.6 at 0 deg: 2(-4.32,-1.56) 3(4.32,-1.56)
  rect 0.3x1 smd: A1(-2.62,3.68) A2(-2.13,3.68) A3(-1.63,3.68) A4(-1.13,3.68) A5(-0.62,3.68) A6(-0.12,3.68) A7(0.38,3.68) A8(0.88,3.68) A9(1.37,3.68) A10(1.87,3.68) A11(2.37,3.68) A12(2.88,3.68) B1(2.63,2.34) B2(2.13,2.34) B3(1.63,2.34) B4(1.13,2.34) B5(0.62,2.34) B6(0.12,2.34) B7(-0.38,2.34) B8(-0.87,2.34) B9(-1.37,2.34) B10(-1.87,2.34) B11(-2.37,2.34) B12(-2.88,2.34)
  oval 1.5x1 hole 0.5 slot 1.2 at 0 deg: ""(-4.06,2.51) ""(4.06,2.51)
  round 0.5 hole 0.5 unplated: ""(-3.4,1.63) ""(3.4,1.63)
  silkscreen extent -6,-10.14 6,1.67, body extent -4.97,-4.24 4.97,4.24, height 3.81
USB-C-SMD_ZX-TYPEC-WTM1628 [mm]
  rect 1.5x1.5 smd paste+0 mask+0.051: 13(-5.12,2.817) 14(-5.12,-1.113) 15(5.12,2.817) 16(5.12,-1.113)
  rect 0.6x1.15 smd paste+0 mask+0.051: A1B12(-3.2,3.392) A4B9(-2.4,3.392) B1A12(3.2,3.392) B4A9(2.4,3.392)
  rect 0.3x1.15 smd paste+0 mask+0.051: A5(-1.25,3.392) A6(-0.25,3.392) A7(0.25,3.392) A8(1.25,3.392) B5(1.75,3.392) B6(0.75,3.392) B7(-0.75,3.392) B8(-1.75,3.392)
  round 0.65 hole 0.65 unplated paste+0: ""(-2.89,2.249) ""(2.89,2.249)
  silkscreen extent -4.45,-3.59 4.45,3.77
USON_10 [mm] "USON_10"
  rect 0.3x0.55 smd: 1(-1,-0.4) 2(-0.5,-0.4) 4(0.5,-0.4) 5(1,-0.4) 6(1,0.4) 7(0.5,0.4) 9(-0.5,0.4) 10(-1,0.4)
  rect 0.4x0.55 smd: 3(0,-0.4) 8(0,0.4)
  silkscreen extent -1.95,-0.95 1.3,0.5
WQFN14-0R50-2R5X2R5EP1R45X1R45 [mm] "WQFN14-0R50-2R5X2R5EP1R45X1R45"
  rect 0.6x0.3 smd: 1(-1.21,0.5) 2(-1.21,0) 3(-1.21,-0.5) 8(1.21,-0.5) 9(1.21,0) 10(1.21,0.5)
  rect 0.3x0.6 smd: 4(-0.75,-1.21) 5(-0.25,-1.21) 6(0.25,-1.21) 7(0.75,-1.21) 11(0.75,1.21) 12(0.25,1.21) 13(-0.25,1.21) 14(-0.75,1.21)
  rect 1.2x1.2 smd: 15(0,0)
  silkscreen extent -2.25,-1.25 1.25,1.25, body extent -1.6,-1.6 1.6,1.6, height 3.81
XH2p54-4p [mm] "XH2P54-4P"
  rect 1.45x1.45 / inner round 1.524 / far side rect 1.45x1.45 hole 0.85: 1(-3.81,0.508)
  round 1.45 hole 0.85: 2(-1.27,0.508) 3(1.27,0.508)
  round 1.45 / inner round 1.524 / far side round 1.45 hole 0.85: 4(3.81,0.508)
  silkscreen extent -6.51,-3.03 6.51,3.05, body extent -6.48,-3.05 6.48,3.05, height 3.81
zh1p5mm_th_2p [mm] "ZH1P5MM_TH_2P"
  round 1.05 hole 0.65: 1(-0.75,0.65) 2(0.75,0.65)
  silkscreen extent -2.25,-1.85 2.25,1.85

## Part data
C1 C2 C8 C12 C17 C18 C210 C211 C218 C219 C226 C228 C230 C233 C280 C281 C303 C304 C305 C306: library part CAP_NP, Voltage=25V, CLASS=DISCRETE, 生命周期=量产
  C1 C2 C17 C18: PCB Footprint=C0603, 价格=0.109811, 品牌=三星, 条码=EBF29060171, 类别=贴片电容0603, 规格="贴片电容10uF 20% 25V X5R 0603", 规格书=三星电容.pdf, 规格编号=CL10A106MA8NRNC
  C8 C12 C219 C226 C228 C230 C233 C280 C281 C306: PCB Footprint=C0805, 价格=0.285631, 品牌=风华, 条码=EBF29060173, 类别=贴片电容0805, 规格="贴片电容22uF 20% 25V X5R 0805", 规格书=风华电容.pdf, 规格编号=0805X226M250NT
  C210 C211 C218 C303 C304 C305: PCB Footprint=C1206, 价格=1.12, 品牌=村田, 条码=EBF29060192, 类别=贴片电容1206, 规格="贴片电容47uF 20% 25V X5R 1206", 规格书=村田贴片电容.pdf, 规格编号=GRM31CR61E476ME44L
C3 C6 C10 C11 C13 C14 C15 C16 C19 C24 C26 C27 C28 C30 C32 C50 C51 C52 C54 C55 C56 C58 C59 C60 C61 C62 C63 C64 C65 C66 C67 C68 C69 C70 C71 C73 C74 C75 C76 C77 C78 C79 C80 C82 C83 C84 C85 C86 C88 C89 C91 C106 C108 C109 C114 C116 C126 C127 C130 C131 C132 C133 C134 C135 C136 C137 C138 C142 C143 C144 C145 C146 C147 C148 C149 C150 C154 C156 C159 C161 C163 C164 C165 C166 C169 C170 C171 C172 C173 C174 C175 C176 C177 C178 C179 C181 C182 C183 C185 C187 C189 C190 C191 C192 C193 C196 C198 C224 C227 C229 C231 C234 C235 C236 C237 C239 C240 C241 C250 C251 C252 C253 C257 C259 C261 C262 C278 C279 C282 C283 C284 C286 C288 C289 C292 C294 C295 C296 C297 C298 C299 C300 C301 C307 C308 C309 C310 C311: library part CAP_NP, Voltage=50V, CLASS=DISCRETE, PCB Footprint=C0402, 类别=贴片电容0402
  C3 C6 C10 C11 C13 C14 C15 C19 C24 C26 C27 C28 C30 C32 C50 C51 C52 C56 C58 C59 C60 C61 C62 C63 C64 C65 C66 C67 C68 C69 C70 C71 C73 C74 C75 C76 C79 C80 C82 C83 C84 C85 C86 C88 C89 C91 C106 C108 C109 C114 C127 C130 C156 C159 C161 C163 C166 C169 C170 C171 C172 C173 C174 C179 C181 C182 C183 C185 C187 C193 C196 C198 C224 C227 C229 C231 C234 C235 C236 C237 C239 C250 C251 C252 C253 C257 C259 C261 C262 C278 C279 C282 C283 C284 C286 C288 C289 C292 C294 C299 C307 C308 C309: 价格=0.029826, 品牌=风华, 条码=EBF29060118, 生命周期=量产, 规格="贴片电容0.1uF 10% 50V X5R 0402", 规格书=风华电容.pdf, 规格编号=0402X104K500NT
  C16 C131 C132 C133 C134 C135 C136 C137 C138 C143 C144 C145 C146 C147 C148 C149 C150 C175 C176 C177 C178 C189 C190 C191 C192: 价格=0.074942, 品牌=太诱, 条码=EBF29060266, 生命周期=量产, 规格="贴片电容0.22uF 20% 50V X5R 0402", 规格书=太诱-贴片电容.pdf, 规格编号=UMK105BJ224MV-F
  C54 C55 C164 C165 C240 C241: 价格=0.00515, 品牌=风华, 条码=EBF29060235, 生命周期=量产, 规格="贴片电容18pF 5% 50V C0G 0402", 规格书=风华电容.pdf, 规格编号=0402CG180J500NT
  C77 C78: 价格=0.00358, 品牌=风华, 条码=EBFCIS221112143723, 规格="贴片电容220pF 10% 50V X7R 0402", 规格书=风华电容.pdf, 规格编号=0402B221K500NT
  C116: 价格=0.018204, 品牌=风华, 条码=EBF29060290, 生命周期=量产, 规格="贴片电容270pF 5% 50V C0G 0402", 规格书=风华电容.pdf, 规格编号=0402CG271J500NT
  C126 C142 C154: 价格=0.034837, 品牌=村田, 条码=EBF29060302, 生命周期=量产, 规格="贴片电容100pF 5% 50V C0G 0402", 规格书=村田040系列贴片电容.pdf, 规格编号=GRT1555C1H101JA
  C295 C296 C297 C298: 价格=0.003808, 品牌=国巨, 条码=EBF29060245, 生命周期=量产, 规格="贴片电容10nF 10% 50V X7R 0402", 规格书=国巨-贴片电容.pdf, 规格编号=CC0402KRX7R9BB103
  C300 C301 C310 C311: 价格=0.006195, 品牌=风华, 条码=EBF29060175, 生命周期=量产, 规格="贴片电容1nF 20% 50V X7R 0402", 规格书=风华电容.pdf, 规格编号=0402B102M500NT
C4 C5 C7 C20 C121 C128 C157 C188 C194 C225 C232 C290: library part CAP_NP, CLASS=DISCRETE, PCB Footprint=C0402, Voltage=NC, 条码=EBF29060149, 类别=贴片电容0402, 规格="贴片电容NC 预留"
C9 C21 C22 C23 C25 C29 C31 C53 C72 C81 C87 C90 C107 C110 C111 C112 C113 C115 C117 C118 C119 C120 C123 C124 C125 C129 C139 C140 C141 C151 C152 C153 C158 C160 C162 C167 C168 C180 C184 C186 C195 C197 C238 C249 C256 C260 C285 C291 C293 C302 C312: library part CAP_NP, Voltage=10V, CLASS=DISCRETE, 生命周期=量产
  C9 C29 C31 C72 C87 C90 C111 C118 C119 C120 C123 C124 C238 C256 C260 C285: PCB Footprint=C0402, 价格=0.518415, 品牌=三星, 条码=EBF29060247, 类别=贴片电容0402, 规格="贴片电容10uF 20% 10V X5R 0402", 规格书=三星电容.pdf, 规格编号=CL05A106MP8NUB8
  C21 C22: PCB Footprint=C0805, 价格=0.368494, 品牌=风华, 条码=EBF29060212, 类别=贴片电容0805, 规格="贴片电容47uF 20% 10V X5R 0805", 规格书=风华电容.pdf, 规格编号=0805X476M100NT
  C23 C129 C158 C160 C180 C195 C197 C249 C291 C293: PCB Footprint=C0603, 价格=0.078818, 品牌=三星, 条码=EBF29060163, 类别=贴片电容0603, 规格="贴片电容22uF 20% 10V X5R 0603", 规格书=三星电容.pdf, 规格编号=CL10A226MP8NUNE
  C25 C81 C112 C113 C115 C117 C139 C140 C141 C151 C152 C153 C162 C167 C302 C312: PCB Footprint=C0402, 价格=0.01191, 品牌=风华, 条码=EBF29060121, 类别=贴片电容0402, 规格="贴片电容1uF 10% 10V X5R 0402", 规格书=风华电容.pdf, 规格编号=0402X105K100NT
  C53 C107 C110 C125 C168 C184 C186: PCB Footprint=C0402, 价格=0.059058, 品牌=国巨, 条码=EBF29060248, 类别=贴片电容0402, 规格="贴片电容4.7uF 10% 10V X5R 0402", 规格书=国巨-贴片电容.pdf, 规格编号=CC0402KRX5R6BB475
C35 C36: library part C, "贴片电容/MLCC电容", BOM名称=无极性贴片电容, 联系下单店铺卖家 免费帮你查找封装="联系下单店铺卖家 免费技术支持"
C57: library part CAP_NP, Voltage=1kv, CLASS=DISCRETE, PCB Footprint=C0805, 价格=0.083527, 品牌=华新科, 条码=EBF29060304, 生命周期=量产, 类别=贴片电容0805, 规格="贴片电容1nF 10% 1kV X7R 0805", 规格书=华新科0805系列高压贴片电容.pdf, 规格编号=0805B102K102CT
C122 C287: library part CAP_NP, Voltage=6.3V, CLASS=DISCRETE, PCB Footprint=C0603, 价格=0.420524, 品牌=三星, 条码=EBF29060263, 生命周期=量产, 类别=贴片电容0603, 规格="贴片电容47uF 20% 6.3V X5R 0603", 规格书=三星电容.pdf, 规格编号=CL10A476MQ8QRNC
CR1: library part BAT_CR1220_CR2032, "微型电池", BOM名称=微型电池, 联系下单店铺卖家 免费技术支持="联系下单店铺卖家 免费帮你查找封装"
D1 D2 D3 D4 D5 D6 D8 D9 D10 D11 D12 D13 D14 D16 D17 D18 D19 D20 D21 D22 D23 D24 D25 D27 D28 D29 D30 D31 D32 D34 D35 D36 D37 D38 D39 D50 D51 D52 D53 D54 D59 D65 D66 D67 D68 D69 D70 D71 D72 D73 D78 D79 D80 D81 D82 D83 D85 D86 D87 D88: library part "DIODE BI-DIR TRIG", 生命周期=量产
  D1: PCB Footprint=SMA_CA, 价格=0.181964, 品牌=伯恩半导体, 条码=EBF29140049, 类别=贴片TVS, 规格="TVS二极管 箝位电压21.5V 击穿电压14.4V 反向关断电压13V", 规格书=伯恩半导体-SMAJ13CA.pdf, 规格编号=SMAJ13CA
  D2 D3 D4 D6 D23 D59: PCB Footprint=esd0402, 品牌=千虹, 备注=通用, 条码=EBFCIS240517170749, 类别=贴片ESD, 规格="防静电保护ESD二极管 反向工作电压3.3V 击穿电压3.5V 钳位电压9V 结电容Cj 10pF", 规格书=千虹_D2315-3R3.pdf, 规格编号=D2315-3R3
  D5 D14 D27 D28 D29 D30 D31 D34 D35 D36 D37 D38 D50 D51 D52 D53 D54 D65 D66 D67 D68 D69 D70 D71 D72 D73: PCB Footprint=R0201, 品牌=千虹, 备注=应用于HDMI2.1, 条码=EBFCIS240604160037, 类别=贴片ESD, 规格="防静电保护ESD二极管 反向工作电压5.5V 击穿电压6V 钳位电压10.5V 结电容Cj 0.17pF", 规格书=千虹_D1250-5R5C.pdf, 规格编号=D1250-5R5C
  D8 D9 D10 D11 D12 D13 D16 D17 D18 D19 D20 D21 D22 D24 D25 D32 D39 D78 D79 D80 D81 D82 D83 D85 D86 D87 D88: PCB Footprint=esd0402, 品牌=千虹, 备注=通用, 条码=EBFCIS240517170922, 类别=贴片ESD, 规格="防静电保护ESD二极管 反向工作电压5V 击穿电压7V 钳位电压10.5V 结电容Cj 0.3pF", 规格书=千虹_D2315-5R0B.pdf, 规格编号=D2315-5R0B
D7 D26 D33 D49: library part DIODE_SCHTKY, CLASS=IC, 生命周期=量产, 类别=贴片肖特基二极管
  D7: PCB Footprint=SOD523, 价格=0.06781, 品牌=江苏长电, 条码=EBFCIS221114153437, 规格="直流反向耐压(Vr)：30V 平均整流电流(Io)：200mA 正向压降(Vf)：500mV@200mA 30V@100mA,VF=350mV@10mA", 规格书=江苏长电_RB521S-30.pdf, 规格编号=RB521S-30
  D26 D33 D49: PCB Footprint=SOD-123, 丝印=SL, 价格=0.175675, 品牌=台湾迪嘉, 条码=EBF29140016, 规格="肖特基二极管 直流反向耐压40V 平均整流电流1A 正向压降0.6V@1A SOD-123", 规格书=1N5819W.pdf, 规格编号=1N5819W
D15: library part DIODE, PCB Footprint=SOD-123, 丝印=T4, 价格=0.061637, 品牌=江苏长电, 条码=EBF29140015, 生命周期=量产, 类别=贴片开关二极管, 规格="开关二极管 反向耐压值100V 平均整流电流150mA 正向压降1.25V 150mA 功率500mW", 规格书=1N4148WT4.pdf, 规格编号=1N4148W
F1: library part FUSE, PCB Footprint=F1812, 价格=0.385618, 品牌=瑞隆源, 条码=EBF29270006, 生命周期=量产, 类别=自恢复保险丝, 规格="自恢复保险丝 最大电压46V 最大电流100A 保持电流2A 跳闸电流4A", 规格书=瑞隆源-自恢复保险丝.pdf, 规格编号=SMD1812P200TF16
H1 H2 H3: Color=黑色, Current Rating=1.5A, LCSC Part Name="配套排母：HX PM2.0-2x4P系列 2x4P 间距:2mm 方针 卧贴", Manufacturer=hanxia(韩下), Operating Temperature=-40℃~+105℃, Voltage Rating (Max)=500V, Add into BOM=yes, Circluar Pins/Square Pins=方针, Contact Material=黄铜, Contact Plating=金, Convert to PCB=yes, Datasheet=https://item.szlcsc.com/datasheet/HX%2520PZ2.0-2x4P%2520WT/48170519.html, Device="HX PZ2.0-2x4P WT", Insulation Height=2mm, Length of End Connection Pin=-, Length of Mating Pin=4mm, Manufacturer Part="HX PZ2.0-2x4P WT", Mounting Type=卧贴, Number of Pins=8P, Number of Rows=双排, Pin Structure=2x4P, Pitch=2mm, Row Spacing=2mm, Supplementary Features=-, Supplier=LCSC, Supplier Footprint=SMD,P=2mm,卧贴, Supplier Part=C46061659, Symbol="HX PZ2.0-2X4P WT"
J1: library part FPC-24P, PCB Footprint=fpc_24p_0p5, 价格=0.368739, 可替代料=EBF29040059, 品牌=钜硕电子, 条码=EBF29040059, 生命周期=量产, 类别=FPC连接器, 规格="FPC连接器 针脚数24 间距0.5mmm 下接 卧贴 翻盖式", 规格书=钜硕电子-FPC间距0.5mm.pdf, 规格编号=AFC01-S24FCA-00
J8: library part TYPE-C-24P, PCB Footprint=usb-c-smd_tyc-324g, 品牌=讯普, 条码=EBFCIS220922094113, 类别=USB接口, 规格="Type-C母座 24P USB-3.1 插座 4固定脚 双向", 规格书=讯普_TYC-324G.pdf, 规格编号=TYC-324G
J12 J42 J43: library part 1X2PIN, 生命周期=量产
  J12: PCB Footprint=zh1p5mm_th_2p, 品牌=长江连接器, 条码=EBF29040095, 类别=线对板连接器, 规格="ZH1.5直插 镀锡 2P 针座连接器", 规格书=长江连接器_A1501WV-2P.PDF, 规格编号=A1501WV-2P
  J42 J43: PCB Footprint=PH-1x2-2P0_l, 价格=0.019031, 可替代料=EBF29040005, 品牌=博穆精密, 条码=EBF29040005, 类别=PH连接器, 规格="直针PH2.0-2P 间距2.0MM 拔插式 接插件", 规格书=博穆精密_PH2.0-A.pdf, 规格编号=PH-2A
J14: library part FPC-30P, PCB Footprint=FPC-30P-0P5, 品牌=讯普, 条码=EBF29040079, 生命周期=量产, 类别=FPC连接器, 规格="FPC连接器 针脚数30 间距0.5mm 高度2.0mm 下接 卧贴 翻盖式", 规格书=FPC-05F-NPH20.pdf, 规格编号=FPC-05F-30PH20
J20: library part PCIEX4_64P, PCB Footprint=PCIE_64PIN_1R00, 品牌=嘉澤端子, 备注="RK3588 BTB底板", 条码=EBFCIS230725213659, 生命周期=量产, 类别=金手指连接器, 规格="PCIEX4连接器 64P 插件", 规格书=嘉澤端子_AAA-PCI-161-K03.pdf, 规格编号=AAA-PCI-161-K03
J38: library part 1X4PIN, PCB Footprint=XH2p54-4p, 价格=0.041116, 可替代料=EBF29040012, 品牌=博穆精密, 条码=EBF29040012, 生命周期=量产, 类别=XH连接器, 规格="直针XH2.54-4P 间距2.54MM 拔插式 接插件 直插", 规格书=博穆精密-XH2.54.pdf, 规格编号=XH-4A
L1 L4 L5 L11 L12 L14 L15 L19 L27 L28 L29: library part BEAD, CLASS=DISCRETE, PCB Footprint=L0603, 生命周期=量产, 类别=贴片磁珠0603
  L1 L4 L5 L11 L12 L14 L15: 价格=0.021567, 品牌=顺络, 条码=EBF29050038, 规格="磁珠100Ω @100MHz 额定电流3A 直流电阻30mΩ", 规格书=顺络-磁珠.pdf, 规格编号=UPZ1608E101-3R0TF
  L19 L27 L28 L29: 价格=0.149038, 品牌=村田, 备注=RK3566广告机, 条码=EBFCIS230428095012, 规格=磁珠1K@100MHz额定电流600mA直流电阻350mΩ, 规格书=村田_BLM18H_SN系列磁珠.pdf, 规格编号=BLM18HE102SN1D
L2 L3 L7 L16 L17 L20 L21 L25 L26: library part IND, CLASS=DISCRETE, 生命周期=量产
  L2 L16 L17 L20 L21 L25 L26: PCB Footprint=l4520, 价格=1.5992, 品牌=台庆, 条码=EBF29050040, 类别=贴片电感0402, 规格="贴片电感3.3uH ±20% 3A 直流电阻69mΩ", 规格书=台庆-功率电感.pdf, 规格编号=TMPC0402HP-3R3MG-Z02
  L3: PCB Footprint=L0518, 价格=0.525895, 品牌=长江微电, 条码=EBFCIS221116170516, 类别=贴片电感SMD, 规格="贴片电感1.5uH ±20% 7.5A 直流电阻25mΩ", 规格书=长江微电_FXL0518-1R5-M.pdf, 规格编号=FXL0518-1R5-M
  L7: PCB Footprint=L2520, 价格=0.129914, 品牌=佳邦, 条码=EBFCIS220927171910, 类别=贴片电感2520, 规格="功率电感2.2uH 2.2uH ±20% 2.06A 85mΩ", 规格书="佳邦_ WIP252012P-2R2ML.pdf", 规格编号=WIP252012P-2R2ML
LED1 LED2: library part LED, "贴片LED", BOM名称=贴片LED, 封装库来自淘宝卖家：黄晶宝石=其他店铺购入均为盗版封装库，无更新权益，请立即申请退款，本店现金奖励200~1000元
MR1 MR2 MR3 MR4 MR5 MR6: library part MARK, "光学定位点", BOM名称=光学定位点, 联系下单店铺卖家 免费技术支持="联系下单店铺卖家 免费帮你查找封装"
Q1 Q5 Q30: library part MOSFET_P, CLASS=IC, PCB Footprint=SOT23, 丝印=KFH-XXX, 价格=0.447836, 品牌=东芝, 条码=EBF29280008, 生命周期=量产, 类别=P-MOS, 规格="P沟道MOS 导通电阻29.8mΩ 电流3A 1.5V可驱动", 规格书=SSM3J328R-LF.pdf, 规格编号="SSM3J328R LF"
Q2 Q31 Q32 Q35: library part NPN, CLASS=IC, PCB Footprint=SOT23, 丝印=Y1, 价格=0.086744, 品牌=江苏长电, 条码=EBF29090001, 生命周期=量产, 类别=贴片三极管SOT-23, 规格="贴片三极管SS8050 集电极电流1.5A 额定功率300mW NPN", 规格书=江苏长电-SS8050Y1.pdf, 规格编号=SS8050
Q3 Q4: library part "MOSFET N", PCB Footprint=SOT23, 品牌=韦尔, 备注=立创停售, 条码=EBF29280014, 类别=N-MOS, 规格="N沟道MOS 导通电阻47mΩ 电流3.6A 4.5V 阈值电压(Vgs(th)@Id)1V 连续漏极电流2.9A", 规格书=WNM2016-3_TR.pdf, 规格编号=WNM2016-3/TR
R1 R2 R3 R4 R5 R6 R7 R8 R9 R10 R11 R12 R13 R14 R15 R16 R17 R18 R19 R24 R25 R26 R27 R28 R29 R30 R31 R32 R33 R34 R35 R36 R37 R38 R39 R40 R43 R48 R49 R50 R51 R52 R53 R54 R55 R56 R57 R58 R59 R60 R61 R62 R63 R64 R65 R66 R67 R68 R69 R70 R71 R72 R73 R74 R75 R76 R77 R78 R79 R80 R81 R82 R83 R84 R85 R86 R87 R88 R89 R90 R91 R92 R93 R94 R95 R96 R97 R98 R99 R110 R111 R112 R113 R114 R115 R116 R117 R118 R119 R120 R121 R122 R123 R124 R125 R126 R127 R128 R129 R130 R131 R132 R133 R134 R135 R136 R137 R138 R139 R140 R141 R142 R143 R144 R145 R146 R147 R148 R149 R150 R151 R152 R153 R154 R155 R156 R157 R158 R159 R160 R161 R162 R163 R164 R165 R166 R167 R168 R169 R170 R171 R172 R173 R174 R175 R176 R177 R178 R179 R180 R181 R182 R183 R184 R185 R186 R187 R188 R189 R190 R191 R192 R193 R194 R195 R196 R197 R198 R199 R210 R211 R212 R213 R216 R217 R218 R219 R220 R221 R222 R223 R224 R225 R226 R227 R228 R229 R230 R231 R232 R233 R234 R235 R236 R237 R238 R239 R240 R241 R242 R243 R244 R245 R246 R247 R248 R249 R250 R251 R252 R255 R256 R257 R271 R272 R273 R274 R275 R276 R277 R278 R279 R280 R281 R282 R283 R284 R285 R290 R291 R301 R303 R306 R308 R309 R316 R317 R318 R319 R320 R321 R322 R323 R324 R325 R326 R327 R328 R334 R335 R341 R342 R343 R344 R345 R346 R347 R348 R349 R350 R351 R352 R354 R373 R374 R375 R376 R377 R378 R379 R380 R381 R382 R383 R386 R387: library part RES, CLASS=DISCRETE
  R1 R2 R5 R19 R67 R113 R125 R283 R290 R291: PCB Footprint=R0402, 品牌=合科泰, 条码=EBF29070053, 生命周期=量产, 类别=贴片电阻0402, 规格="贴片电阻100R 1% 1/16W 0402", 规格书=合科泰-RI系列电阻.pdf, 规格编号=RI0402L1000FT
  R3 R35 R38 R39 R40 R43 R69 R87 R110 R111 R121 R132 R135 R139 R150 R171 R173 R176 R192 R193 R194 R195 R196 R197 R198 R199 R222 R223 R225 R226 R233 R236 R237 R252 R255 R257 R276 R317 R319 R321 R328 R335 R346 R352: PCB Footprint=R0402, 价格=0.002773, 品牌=厚声, 条码=EBF29070046, 生命周期=量产, 类别=贴片电阻0402, 规格="贴片电阻10K 1% 1/16W 0402", 规格书=厚声-无铅厚膜电阻.pdf, 规格编号=0402WGF1002TCE
  R4 R36 R316: PCB Footprint=R0402, 价格=0.006087, 品牌=国巨, 条码=EBF29070290, 生命周期=量产, 类别=贴片电阻0402, 规格="贴片电阻115K 1% 1/16W 0402", 规格书=YAGEO国巨厚膜无铅电阻.pdf, 规格编号=AC0402FR-07115KL
  R6 R24 R33 R34 R65 R93 R96 R133 R140 R144 R146 R153 R169 R174 R190 R221 R246 R251 R256 R273 R306 R318 R320 R324 R334 R345 R351: PCB Footprint=R0402, 品牌=合科泰, 条码=EBF29070050, 生命周期=量产, 类别=贴片电阻0402, 规格="贴片电阻1K 1% 1/16W 0402", 规格书=合科泰-RI系列电阻.pdf, 规格编号=RI0402L1001FT
  R7 R149 R271 R322 R343 R344 R349 R350: PCB Footprint=R0402, 价格=0.002473, 品牌=厚声, 条码=EBF29070223, 生命周期=量产, 类别=贴片电阻0402, 规格="贴片电阻20K 1% 1/16W 0402", 规格书=厚声-无铅厚膜电阻.pdf, 规格编号=0402WGF2002TCE
  R8: PCB Footprint=R0402, 价格=0.003117, 品牌=厚声, 条码=EBFCIS221116113428, 生命周期=量产, 类别=贴片电阻0402, 规格="贴片电阻3.3R 1% 1/16W 0402", 规格书=厚声-无铅厚膜电阻.pdf, 规格编号=0402WGF330KTCE
  R9: PCB Footprint=R0402, 品牌=合科泰, 条码=EBF29070241, 生命周期=量产, 类别=贴片电阻0402, 规格="贴片电阻510K 1% 1/16W 0402", 规格书=合科泰-RI系列电阻.pdf, 规格编号=RI0603L5103FT
  R10 R13 R18 R25 R26 R27 R28 R29 R30 R31 R32 R70 R78 R97 R98 R284 R301 R303: PCB Footprint=R0402, 条码=EBF29070087, 类别=贴片电阻0402, 规格="贴片电阻NC 预留"
  R11 R48 R49 R50 R58 R59 R60 R61 R62 R63 R72 R73 R74 R77 R128 R147 R151 R152 R154 R155 R172 R175 R224: PCB Footprint=R0402, 品牌=合科泰, 条码=EBF29070047, 生命周期=量产, 类别=贴片电阻0402, 规格="贴片电阻4.7K 1% 1/16W 0402", 规格书=合科泰-RI系列电阻.pdf, 规格编号=RI0402L4701FT
  R12: PCB Footprint=R0402, 价格=0.00683, 品牌=国巨, 条码=EBF29070011, 生命周期=量产, 类别=贴片电阻0402, 规格="贴片电阻43K 1% 1/16W 0402", 规格书=YAGEO国巨厚膜无铅电阻.pdf, 规格编号=AC0402FR-0743KL
  R14 R15 R16 R92 R94 R116 R118 R119 R138 R218 R249 R272: PCB Footprint=R0402, 品牌=合科泰, 条码=EBF29070054, 生命周期=量产, 类别=贴片电阻0402, 规格="贴片电阻100K 1% 1/16W 0402", 规格书=合科泰-RI系列电阻.pdf, 规格编号=RI0402L1003FT
  R17: PCB Footprint=R0402, 价格=0.001521, 品牌=厚声, 条码=EBFCIS221112140245, 生命周期=量产, 类别=贴片电阻0402, 规格="贴片电阻7.5K 1% 1/16W 0402", 规格书=厚声-无铅厚膜电阻.pdf, 规格编号=0402WGF7501TCE
  R37 R75 R76 R83 R84 R85 R86 R89 R91 R114 R117 R120 R122 R124 R130 R134 R137 R156 R177 R247 R248 R280 R285 R327 R381 R382 R383: PCB Footprint=R0402, 品牌=合科泰, 条码=EBF29070049, 生命周期=量产, 类别=贴片电阻0402, 规格="贴片电阻0R 1% 1/16W 0402", 规格书=合科泰-RI系列电阻.pdf, 规格编号=RI0402L000FT
  R51 R52 R54 R55 R56 R57 R145 R148 R230 R275 R277 R278 R279 R281 R282 R387: PCB Footprint=R0402, 品牌=合科泰, 条码=EBF29070181, 生命周期=量产, 类别=贴片电阻0402, 规格="贴片电阻22R 1% 1/16W 0402", 规格书=合科泰-RI系列电阻.pdf, 规格编号=RI0402L22R0FT
  R53: PCB Footprint=R0402, 价格=0.004709, 品牌=厚声, 条码=EBF29070292, 生命周期=量产, 类别=贴片电阻0402, 规格="贴片电阻2.49K 1% 1/16W 0402", 规格书=厚声-无铅厚膜电阻.pdf, 规格编号=0402WGF2491TCE
  R64 R66: PCB Footprint=R0603, 品牌=合科泰, 条码=EBF29070091, 生命周期=量产, 类别=贴片电阻0603, 规格="贴片电阻510R 1% 1/10W 0603", 规格书=合科泰-RI系列电阻.pdf, 规格编号=RI0603L5100FT
  R68: PCB Footprint=R0402, 价格=0.002198, 品牌=厚声, 条码=EBF29070275, 生命周期=量产, 类别=贴片电阻0402, 规格="贴片电阻120R 1% 1/16W 0402", 规格书=厚声-无铅厚膜电阻.pdf, 规格编号=0402WGF1200TCE
  R71: PCB Footprint=R0805, 价格=0.02396, 品牌=国巨, 条码=EBF29070294, 生命周期=量产, 类别=贴片电阻0805, 规格="贴片电阻1M 1% 1/8W 0805", 规格书=YAGEO国巨厚膜无铅电阻.pdf, 规格编号=AC0805FR-071ML
  R79 R80 R81 R82 R88 R90 R142 R143 R235: PCB Footprint=R0402, 价格=0.003072, 品牌=厚声, 条码=EBF29070280, 生命周期=量产, 类别=贴片电阻0402, 规格="贴片电阻2.2R 1% 1/16W 0402", 规格书=厚声-无铅厚膜电阻.pdf, 规格编号=0402WGF220KTCE
  R95 R99 R308 R309 R323: PCB Footprint=R0402, 品牌=合科泰, 条码=EBF29070186, 生命周期=量产, 类别=贴片电阻0402, 规格="贴片电阻3.4K 1% 1/16W 0402", 规格书=合科泰-RI系列电阻.pdf, 规格编号=RI0402L3401FT
  R112: PCB Footprint=R0402, 价格=0.003317, 品牌=厚声, 条码=EBFCIS221112135607, 生命周期=量产, 类别=贴片电阻0402, 规格="贴片电阻4.7R 1% 1/16W 0402", 规格书=厚声-无铅厚膜电阻.pdf, 规格编号=0402WGF470KTCE
  R115: PCB Footprint=R0402, 品牌=合科泰, 条码=EBF29070051, 生命周期=量产, 类别=贴片电阻0402, 规格="贴片电阻2.2K 1% 1/16W 0402", 规格书=合科泰-RI系列电阻.pdf, 规格编号=RI0402L2201FT
  R123 R234 R325: PCB Footprint=R0402, 价格=0.002728, 品牌=厚声, 条码=EBF29070284, 生命周期=量产, 类别=贴片电阻0402, 规格="贴片电阻470R 1% 1/16W 0402", 规格书=厚声-无铅厚膜电阻.pdf, 规格编号=0402WGF4700TCE
  R126 R136: PCB Footprint=R0402, 价格=0.001622, 品牌=厚声, 条码=EBFCIS221112135212, 生命周期=量产, 类别=贴片电阻0402, 规格="贴片电阻1.1K 1% 1/16W 0402", 规格书=厚声-无铅厚膜电阻.pdf, 规格编号=0402WGF1101TCE
  R127 R129 R210 R211 R212 R213: PCB Footprint=R0805, 品牌=合科泰, 条码=EBF29070064, 生命周期=量产, 类别=贴片电阻0805, 规格="贴片电阻0R 1% 1/8W 0805", 规格书=合科泰-RI系列电阻.pdf, 规格编号=RI0805L0000FT
  R131: PCB Footprint=R0805, 条码=EBF29070089, 类别=贴片电阻0805, 规格="贴片电阻NC 预留"
  R141 R227 R250 R274: PCB Footprint=R0402, 品牌=合科泰, 条码=EBF29070048, 生命周期=量产, 类别=贴片电阻0402, 规格="贴片电阻30K 1% 1/16W 0402", 规格书=合科泰-RI系列电阻.pdf, 规格编号=RI0402L3002FT
  R157 R158 R160 R178 R179 R181: PCB Footprint=R0402, 品牌=厚声, 条码=EBF29070247, 生命周期=量产, 类别=贴片电阻0402, 规格="贴片电阻47K 1% 1/16W 0402", 规格书=厚声-无铅厚膜电阻.pdf, 规格编号=0402WGF4702TCE
  R159 R180: PCB Footprint=R0402, 价格=0.001447, 品牌=厚声, 条码=EBFCIS221112112140, 生命周期=量产, 类别=贴片电阻0402, 规格="贴片电阻1.2K 1% 1/16W 0402", 规格书=厚声-无铅厚膜电阻.pdf, 规格编号=0402WGF1201TCE
  R161 R162 R163 R164 R165 R166 R167 R168 R182 R183 R184 R185 R186 R187 R188 R189: PCB Footprint=R0402, 价格=0.003791, 品牌=厚声, 条码=EBF29070287, 生命周期=量产, 类别=贴片电阻0402, 规格="贴片电阻499R 1% 1/16W 0402", 规格书=厚声-无铅厚膜电阻.pdf, 规格编号=0402WGF4990TCE
  R170 R191 R354: PCB Footprint=R0402, 价格=0.007054, 品牌=国巨, 条码=EBF29070003, 生命周期=量产, 类别=贴片电阻0402, 规格="贴片电阻27K 1% 1/16W 0402", 规格书=YAGEO国巨厚膜无铅电阻.pdf, 规格编号=AC0402FR-0727KL
  R216 R217 R228 R229 R238 R239 R242 R243: PCB Footprint=R0402, 价格=0.002158, 品牌=厚声, 条码=EBF29070187, 生命周期=量产, 类别=贴片电阻0402, 规格="贴片电阻33R 1% 1/16W 0402", 规格书=厚声-无铅厚膜电阻.pdf, 规格编号=0402WGF330JTCE
  R219 R220 R231 R232 R240 R241 R244 R245: PCB Footprint=R0402, 价格=0.002703, 品牌=厚声, 条码=EBF29070059, 生命周期=量产, 类别=贴片电阻0402, 规格="贴片电阻49.9R 1% 1/16W 0402", 规格书=厚声-无铅厚膜电阻.pdf, 规格编号=0402WGF499JTCE
  R326: PCB Footprint=R0402, 品牌=合科泰, 条码=EBF29070220, 生命周期=量产, 类别=贴片电阻0402, 规格="贴片电阻300K 1% 1/16W 0402", 规格书=合科泰-RI系列电阻.pdf, 规格编号=RI0402L3003FT
  R341 R347: PCB Footprint=R0603, 品牌=合科泰, 条码=EBF29070063, 生命周期=量产, 类别=贴片电阻0603, 规格="贴片电阻0R 1% 1/10W 0603", 规格书=合科泰-RI系列电阻.pdf, 规格编号=RI0603L0000FT
  R342 R348: PCB Footprint=R0603, 条码=EBF29070088, 类别=贴片电阻0603, 规格="贴片电阻NC 预留"